# Altium PCB TYH-PD67W 2C1A AC板0722.pcbdoc
Units mm, origin at the board's own origin, x right, y up, seen from the top; angles counter-clockwise.
Board outline 22.5 x 16 mm, 5 copper layers (Top Layer, Signal Layer 3, Signal Layer 1, Signal Layer 2, Bottom Layer), stack 0.941 mm thick; 7 components, 178 nets, 30 pads, 78 vias.
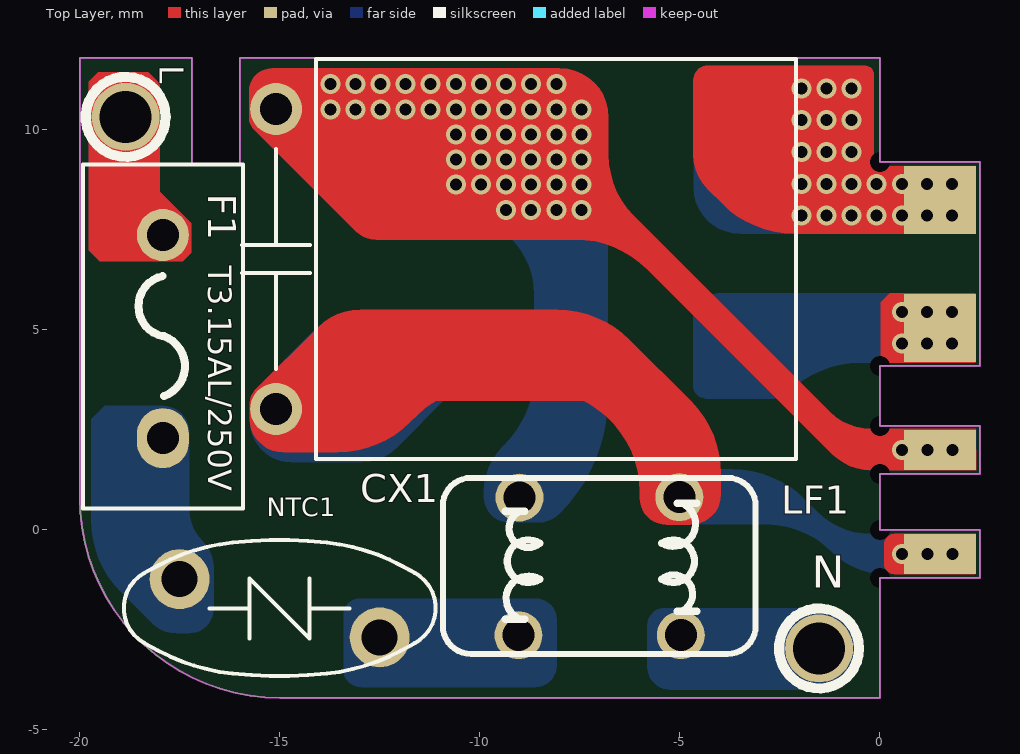
[diagram p0: Top Layer view]
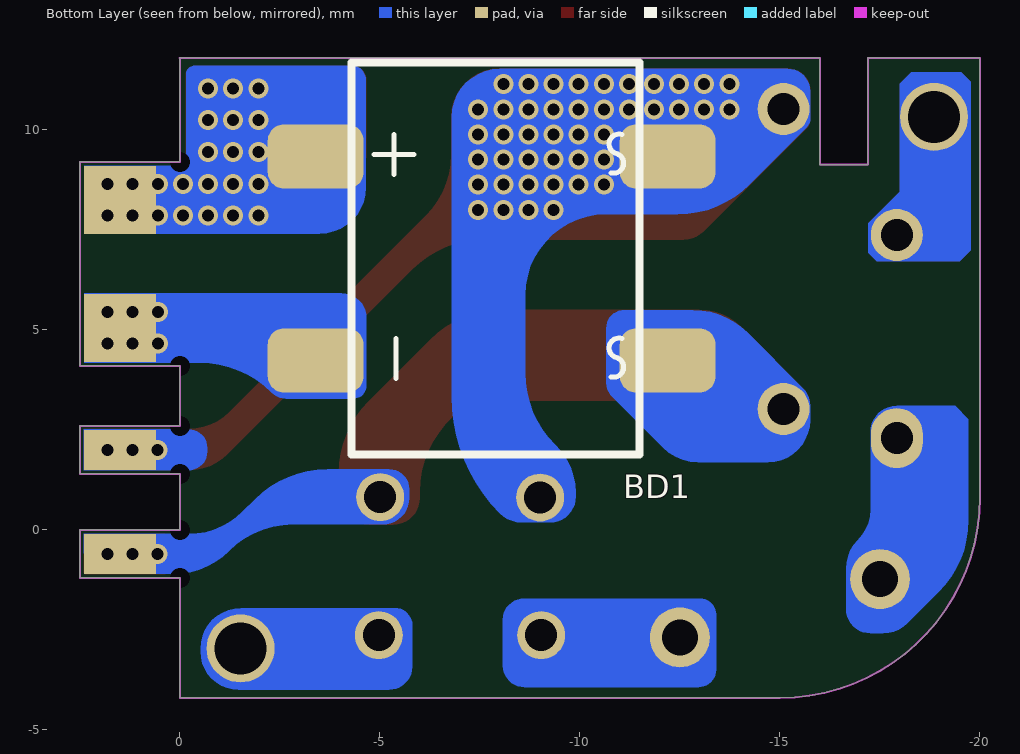
[diagram p1: Bottom Layer view, seen from below]

## Layer stack, top to bottom
Top Solder: solder mask 0.0102, Solder Resist, Dk 3.5
Top Layer: signal copper 0.0356
Dielectric 1: core 0.254, FR-4, Dk 4.2
Signal Layer 3: signal copper 0.036
Dielectric 4: prepreg 0.127, Dk 4.2
Signal Layer 1: signal copper 0.036
Dielectric 2: core 0.254, Dk 4.2
Signal Layer 2: signal copper 0.036
Dielectric 3: prepreg 0.127, Dk 4.2
Bottom Layer: signal copper 0.0356
Bottom Solder: solder mask 0.0102, Solder Resist, Dk 3.5

## Board outline
-20,0.8 ccw(c-15,0.8) -15,-4.2 0,-4.2 0,-1.2 2.5,-1.2 2.5,0 0,0 0,1.4 2.5,1.4 2.5,2.6 0,2.6 0,4.1 2.5,4.1 2.5,9.2 0,9.2 0,11.8 -16,11.8 -16,9.131 -17.2,9.131 -17.2,11.8 -20,11.8

## Design rules (kind name [scope] priority, off if disabled: settings)
Clearance Clearance_22 [InNet('HV') vs InNet('SW')] p1: gap=1.2
Clearance Clearance_21 [InNet('NetRX3_2') vs InNet('PGND')] p2: gap=1.5
Clearance Clearance_20 [InNet('NetBD1_1') vs InNet('PGND')] p3: gap=1.5
Clearance Clearance_19 [InNet('NetC4_2') vs InNet('PGND')] p4: gap=0.4
Clearance Clearance_18 [InNet('NetR15_1') vs InNet('PGND')] p5: gap=1
Clearance Clearance_17 [InNet('NetN_1') vs InNet('NetBD1_1')] p6: gap=1.55
Clearance Clearance_16 [InNet('NetN_1') vs InNet('PGND')] p7: gap=1.5
Clearance Clearance_15 [InNet('VIN') vs InNet('PGND')] p8 off: gap=5.8
Clearance Clearance_14 [InNet('CS') vs InNet('Bais-L')] p9: gap=0.45
Clearance Clearance_13 [InNet('SW') vs InNet('CS')] p10: gap=1.5
Clearance Clearance_12 [InNet('NetR15_1') vs InNet('CS')] p11: gap=1
Clearance Clearance_11 [InNet('NetBD1_3') vs InNet('CS')] p12: gap=1.1
Clearance Clearance_10 [InNet('HV') vs InNet('CS')] p13: gap=1.1
Clearance Clearance_9 [InNet('NetL2_1') vs InNet('CS')] p14: gap=1.5
Clearance Clearance_8 [InNet('NetC1_2') vs InNet('PGND')] p15: gap=1.2
Clearance Clearance_7 [InNet('NetBD1_3') vs InNet('PGND')] p16: gap=1.2
Clearance Clearance_6 [InNet('NetC2_2') vs InNet('PGND')] p17: gap=1.3
Clearance Clearance_5 [InNet('Bais-L') vs InNet('PGND')] p18: gap=0.45
Clearance Clearance_4 [InNet('SW') vs InNet('PGND')] p19: gap=1.5
Clearance Clearance_3 [InNet('HV') vs InNet('PGND')] p20: gap=1.2
Clearance Clearance_2 [InNet('NetL2_1') vs InNet('PGND')] p21: gap=1.5
Clearance Clearance_1 [OnLayer('Keep-Out Layer')] p22: gap=0.1
Clearance [All] p23: gap=0.2
PlaneConnect [All] p1: planeconnectstyle=Direct reliefexpansion=0.508 reliefentries=4 reliefconductorwidth=0.3 reliefairgap=0.254
PolygonConnect [All] p1: connectstyle=Direct reliefconductorwidth=0.3 reliefentries=4 polygonreliefangle="90 Angle" airgapwidth=0.3
RoutingVias [All] p1: holewidth=0.711 width=1.27 viastyle="Through Hole" minholewidth=0.711 minwidth=1.27 maxholewidth=0.711 maxwidth=1.27
SolderMaskExpansion [All] p1: expansion=0.05
Width [All] p1: maxlimit=10 minlimit=0.1 preferedwidth=0.2
28 further rules are at their usual default settings.

## Components (designator, comment, footprint, x,y, rotation, side; value= is the part's Value field where it differs from the comment)
BD1 "WRMSB40M" BD-WRLSB80M -3.397,9.334 r180 bottom
CX1 "0.1uF" X-0.22SW -15.095,3.02 r90 top
F1 "T3.15AL/250V" FUSE-5mm-l -17.924,7.371 r270 top
L "Comment" PAD-AC -18.854,10.323 r90 top
LF1 "Comment" L-6*3*3 -3.305,-0.902 r270 top
N "Comment" PAD-AC -1.518,-2.966 r90 top
NTC1 "" 5D-7-2 -15.004,-1.967 r180 top (schematic designator NTC)

## Footprints (in the part's own frame and the unit in brackets; to place one, negate y for a bottom-side part, rotate by r counter-clockwise, add the part's x,y. Pads: shape width x height; smd on the part's side, far side on the other; paste and mask are expansions set on the pad)
5D-7-2 [mm]
  round 1.5 hole 0.9: 1(2.5,-0.735) 2(-2.503,0.723)
  silkscreen extent -3.9,-1.71 3.9,1.69, body extent -4.5,-1.79 4.5,1.79, height 9.5
BD-WRLSB80M [mm]
  rrect50% 2.4x1.6 smd: 1(0,0) 2(8.8,0) 3(8.8,-5.1) 4(0,-5.1)
  silkscreen extent 0.9,-7.45 8.1,2.35, body extent -0.61,-7.55 9.39,2.45, height 1.61
FUSE-5mm-l [mm]
  round 1.3 hole 0.8: 1(0,0)
  oval 1.5x1.3 hole 0.8: 2(5.08,0)
  silkscreen extent -1.76,-2 6.84,2, body extent -1.76,-2 6.84,2, height 5.2
L-6*3*3 [mm]
  round 1.2 hole 0.8: 1(1.733,-5.729) 2(1.734,-1.669) 3(-1.708,-5.703) 4(-1.72,-1.706)
  silkscreen extent -2.2,-7.62 2.2,0.2, body extent -1.95,-7.4 2,0.02, height 7.21
PAD-AC [mm]
  round 1.7 hole 1.3: 1(0,0)
  silkscreen extent -1,-1 1,1
X-0.22SW [mm]
  round 1.3 hole 0.8: 1(0,0) 2(7.5,0)
  silkscreen extent -1.25,-13 8.75,0.85, body extent -1.25,-13 8.75,0.2, height 5.2

## Part data
BD1: library part BRIDGE1
CX1: library part Cap_dip, "Capacitor"
F1: library part FUSE2
NTC1: library part NTC

## Free pads (board coordinates)
  round 0.2 hole 0.5: 0(0,1.4) 0(0,4.1) 0(0,9.2) 0(0,-1.2) 0(0,0) 0(0,2.6)
  rect 1.8x1 smd far side: 0(1.5,-0.6) 0(1.5,2)
  rect 1.8x1 smd: 0(1.5,-0.6) 0(1.5,2)
  rect 1.8x1.7 smd far side: 0(1.5,5.05) 0(1.5,8.25)
  rect 1.8x1.7 smd: 0(1.5,5.05) 0(1.5,8.25)

## Via types
v1: diameter 0.5, hole 0.3, Top Layer to Bottom Layer, tented both sides, 78 vias

## Nets (pads, with @x,y where several pads share a name; then routed paths per layer and width w, separated by ;. In a path a pad name is that pad's centre, name@x,y a point inside that pad or via, vN(x,y) a via of type N, cw(c..) or ccw(c..) an arc to the next point about the centre after c; other vN are vias at no path point)
3.3V: 
A: 
A+: 
A-: 
BACK_LED: 
Bais-L: 
BOOT0: 
BUTTON: 
CC1: 
CC2: 
CPA: 
CS: 
D: 
D25_INT: 
D31_EN1: 
D31_EN2: 
D31_INT1: 
D+: 
D-: 
DM: 
DP: 
EM: 
EN: 
EN_IC: 
FB: 
FLASH_CLK: 
FLASH_CS: 
FLASH_MISO: 
FLASH_MOSI: 
G-SR: 
GND-C: 
HV: 
ISET: 
KEY: 
KEY1: 
LCD_CS: 
LCD_DC: 
LCD_EN2: 
LCD_MOSI: 
LCD_RES: 
LCD_TE: 
LEDA: 
M: 
N: LF1.2 N.1
NetBD1_1: BD1.2 CX1.2 LF1.3 pad.0@0,1.4 pad.0@0,2.6 pad.0@1.5,2 | length 0.5
  Bottom Layer w0.2: v1@0.595,2 pad.0@1.127,2
  other v1: 0.558,2 1.186,2 1.814,2 -9.343,8.001 -8.715,8.001 -8.088,8.001 -7.46,8.001 -10.599,8.629 -9.971,8.629 -9.343,8.629 -8.715,8.629 -8.088,8.629 -7.46,8.629 -10.599,9.256 -9.971,9.256 -9.343,9.256 -8.715,9.256 -8.088,9.256 -7.46,9.256 -10.599,9.884 -9.971,9.884 -9.343,9.884 -8.715,9.884 -8.088,9.884 -7.46,9.884 -13.738,10.512 -13.11,10.512 -12.483,10.512 -11.855,10.512 -11.227,10.512 -10.599,10.512 -9.971,10.512 -9.343,10.512 -8.715,10.512 -8.088,10.512 -7.46,10.512 -13.738,11.14 -13.11,11.14 -12.483,11.14 -11.855,11.14 -11.227,11.14 -10.599,11.14 -9.971,11.14 -9.343,11.14 -8.715,11.14 -8.088,11.14
NetBD1_3: BD1.1 pad.0@0,9.2 pad.0@1.5,8.25 | length 1.5
  Bottom Layer w0.2: -0.415,8.25 pad.0@1.127,8.25
  other v1: -1.961,7.852 -1.334,7.852 -0.706,7.852 -0.078,7.852 0.55,7.852 1.178,7.852 1.806,7.852 -1.961,8.648 -1.334,8.648 -0.706,8.648 -0.078,8.648 0.55,8.648 1.178,8.648 1.806,8.648 -1.961,9.444 -1.334,9.444 -0.706,9.444 -1.961,10.241 -1.334,10.241 -0.706,10.241 -1.961,11.037 -1.334,11.037 -0.706,11.037
NetBD2_1: 
NetC1_1: 
NetC1_2: 
NetC2_2: 
NetC3_2: 
NetC4_1: 
NetC4_2: 
NetC5_2: 
NetC6_1: 
NetC10_2: 
NetC21_1: 
NetC22_1: 
NetC24_1: 
NetC25_2: 
NetC26_2: 
NetC30_2: 
NetC31_2: 
NetC100_2: 
NetC101_1: 
NetC101_2: 
NetC112_1: 
NetD4_K: 
NetF1_1: F1.1 L.1
NetF1_2: F1.2 NTC1.1
NetKEY1_1: 
NetL2_1: 
NetLF1_2: LF1.1 NTC1.2
NetN_1: BD1.3 CX1.1 LF1.4 pad.0@0,0 pad.0@0,-1.2 pad.0@1.5,-0.6 | length 0.5
  Bottom Layer w0.2: v1@0.595,-0.6 pad.0@1.127,-0.6
  other v1: 0.558,-0.6 1.186,-0.6 1.814,-0.6
NetNTC2_1: 
NetQ1_3: 
NetQ3_4: 
NetQ3_G: 
NetR3_1: 
NetR4_1: 
NetR15_1: 
NetR25_2: 
NetR29_1: 
NetR31_2: 
NetR32_2: 
NetR41_2: 
NetR42_2: 
NetR134_1: 
NetRX1_2: 
NetRX3_2: 
NetU1_26: 
NetU1_27: 
NetU1_28: 
NetU1_29: 
NetU1_30: 
NetU1_32: 
NewNet1: 
NewNet2: 
NewNet3: 
NewNet4: 
NewNet5: 
NewNet6: 
NewNet7: 
NewNet8: 
NewNet9: 
NewNet10: 
NewNet11: 
NewNet12: 
NewNet13: 
NewNet14: 
NewNet15: 
NewNet16: 
NewNet18: 
NewNet22: 
NewNet23: 
NewNet24: 
NewNet25: 
NewNet28: 
NewNet32: 
NewNet33: 
NewNet34: 
NewNet36: 
NewNet38: 
NewNet40: 
NewNet41: 
NewNet42: 
OPTO: 
OTP: 
PA2: 
PA4: 
PA5: 
PA6: 
PA7: 
PA8: 
PA9: 
PB0: 
PB1: 
PB7: 
PF0: 
PF1: 
PF3: 
PGND: BD1.4 pad.0@0,4.1 pad.0@1.5,5.05
  other v1: 0.55,4.652 1.178,4.652 1.806,4.652 0.55,5.448 1.178,5.448 1.806,5.448
RS: 
RST: 
RX: 
SCL: 
SCL1: 
SDA: 
SDA1: 
SET: 
SGND: 
SRCG_A: 
SW: 
SW-SR: 
SWCLK: 
SWCLK1: 
SWCLK2: 
SWDIO: 
SWDIO1: 
SWDIO2: 
SWRST: 
TX: 
TXD: 
U2-2: 
V3V3: 
VBUS: 
VC: 
VDD: 
VDD1: 
VDS: 
VFB: 
VFB1: 
VIN: 
VIN_3V: 
VMS: 
VOUT1: 
VXO: 
XGND: 

## Keep-outs
Keep-Out Layer:
  the board outline again, w0.05

## Other copper
Top Layer:
  rectangle net NetN_1: -11.788,3.216 -6.537,3.859
  region net NetF1_1: -19.539,11.44 -18.287,11.44 -17.999,11.152 -17.999,8.448 -17.217,7.666 -17.217,6.928 -17.429,6.715 -19.501,6.715 -19.774,6.989 -19.774,11.205
  region net PGND: 2.391,4.174 0.217,4.174 0.025,4.366 0.025,5.685 0.253,5.913 2.391,5.913
  region net NetBD1_3: 2.394,7.404 -2.135,7.404 cw(c-2.135,9.944) -3.931,8.148 -4.3,8.517 cw(c-3.428,9.389) -4.661,9.389 -4.661,11.246 cw(c-4.305,11.246) -4.305,11.602 -0.371,11.602 cw(c-0.371,11.382) -0.151,11.382 -0.151,9.228 ccw(c-0.009,9.228) -0.009,9.087 2.394,9.087
  region net NetBD1_1: 2.406,1.489 -0.22,1.489 cw(c-0.22,2.862) -1.19,1.891 -5.812,6.513 ccw(c-7.608,4.717) -7.608,7.257 -12.604,7.257 cw(c-12.604,7.938) -13.085,7.457 -15.672,10.043 cw(c-15.442,10.273) -15.767,10.273 -15.767,10.969 cw(c-15.2,10.969) -15.2,11.536 -8.002,11.536 cw(c-8.002,10.32) -6.786,10.32 -6.786,9.385 ccw(c-4.611,9.385) -6.149,7.846 -1.254,2.95 ccw(c-0.221,3.983) -0.221,2.523 2.397,2.523
  region net NetN_1: -15.75,3.18 -15.75,2.77 ccw(c-14.92,2.77) -14.92,1.94 -13.547,1.94 ccw(c-13.547,4.48) -11.751,2.684 -11.556,2.879 cw(c-10.079,1.402) -10.079,3.49 -8.539,3.49 cw(c-8.539,0.95) -5.999,0.95 -5.999,0.791 ccw(c-5.335,0.791) -5.335,0.126 -4.734,0.126 ccw(c-4.734,0.886) -3.974,0.886 -3.974,1.415 ccw(c-6.514,1.415) -4.718,3.211 -6.262,4.755 ccw(c-8.058,2.959) -8.058,5.499 -12.992,5.499 ccw(c-12.992,4.009) -14.045,5.063 -15.624,3.483 ccw(c-15.322,3.18)
  region net NetN_1: 0.11,-0.643 0.11,-0.36 cw(c0.366,-0.36) 0.366,-0.104 2.396,-0.104 2.396,-1.077 cw(c2.367,-1.077) 2.367,-1.105 0.363,-1.105 cw(c0.363,-0.853) 0.111,-0.853
Bottom Layer:
  region net NetF1_1: -19.539,11.44 -18.287,11.44 -17.999,11.152 -17.999,8.448 -17.217,7.666 -17.217,6.928 -17.429,6.715 -19.501,6.715 -19.774,6.989 -19.774,11.205
  region net NetN_1: 2.389,-1.098 0.157,-1.105 cw(c0.157,0.838) -1.217,-0.536 ccw(c-2.832,-2.15) -2.832,0.133 -5.072,0.133 cw(c-5.072,0.794) -5.733,0.794 -5.733,1.019 cw(c-5.241,1.019) -5.241,1.512 -3.681,1.512 cw(c-3.681,-1.028) -1.884,0.768 -1.575,0.458 ccw(c-0.218,1.815) -0.218,-0.104 2.396,-0.104
  region net NetBD1_1: -8.002,11.525 -15.2,11.525 ccw(c-15.2,10.964) -15.761,10.964 -15.761,10.273 ccw(c-15.464,10.273) -15.674,10.063 -14.24,8.629 ccw(c-12.444,10.425) -12.444,7.885 -10.653,7.885 cw(c-10.653,5.868) -8.636,5.868 -8.636,3.928 cw(c-11.176,3.928) -9.38,2.132 -9.41,2.102 ccw(c-8.232,0.923) -9.898,0.923 -9.898,0.827 ccw(c-9.257,0.827) -9.257,0.185 -8.534,0.185 ccw(c-8.534,0.926) -8.01,0.402 ccw(c-10.939,3.331) -6.797,3.331 -6.797,10.32 ccw(c-8.002,10.32)
  region net N: -5.136,-1.958 -1.527,-1.958 cw(c-1.527,-2.966) -0.518,-2.966 -0.518,-3.048 cw(c-1.467,-3.048) -1.467,-3.997 -5.237,-3.997 cw(c-5.237,-3.424) -5.81,-3.424 -5.81,-2.38 cw(c-5.388,-2.38) -5.388,-1.958 -5.171,-1.958
  region net NetLF1_2: -12.718,-1.719 -8.6,-1.719 cw(c-8.6,-2.241) -8.078,-2.241 -8.078,-3.397 cw(c-8.614,-3.397) -8.614,-3.933 -12.969,-3.933 cw(c-12.969,-3.496) -13.406,-3.496 -13.406,-2.115 cw(c-13.009,-2.115) -13.009,-1.718
  region net PGND: 2.391,5.913 -4.049,5.913 ccw(c-4.049,5.298) -4.664,5.298 -4.664,3.601 ccw(c-4.343,3.601) -4.343,3.28 -2.645,3.28 ccw(c-2.645,3.769) -2.299,3.423 -2.292,3.43 cw(c-0.496,1.634) -0.496,4.174 2.391,4.174
  region net NetBD1_3: 2.394,7.404 -3.494,7.404 cw(c-3.494,8.564) -4.654,8.564 -4.654,11.246 cw(c-4.298,11.246) -4.298,11.602 -0.375,11.602 cw(c-0.375,11.382) -0.155,11.382 -0.155,9.244 ccw(c-0.009,9.244) -0.009,9.099 2.394,9.099
  region net NetN_1: -10.667,4.166 -10.667,3.672 cw(c-11.16,3.672) -10.811,3.323 -12.082,2.053 cw(c-12.952,2.923) -12.952,1.692 -14.714,1.692 cw(c-14.714,2.734) -15.755,2.734 -15.755,3.095 cw(c-15.104,3.095) -15.565,3.556 -14.183,4.937 cw(c-12.838,3.592) -12.838,5.494 -11.116,5.494 cw(c-11.116,5.044) -10.665,5.044
  region net NetF1_2: -17.921,3.099 -19.381,3.099 -19.715,2.765 -19.715,0.242 ccw(c-17.175,0.242) -18.971,-1.554 -18.19,-2.336 ccw(c-17.589,-1.735) -17.589,-2.585 -17.266,-2.585 ccw(c-17.266,-1.976) -16.657,-1.976 -16.657,-0.966 ccw(c-17.661,-0.966) -16.951,-0.257 cw(c-16.181,0.514) -17.27,0.514 -17.27,2.451 ccw(c-17.918,2.451) -17.918,3.098
  region net NetBD1_1: -0.22,1.489 2.406,1.489 2.406,2.514 -0.221,2.514 ccw(c-0.221,2.054) -0.68,2.054 -0.68,1.95 ccw(c-0.22,1.95)